# Altium PCB V3_Board.PcbDoc (part 1 of 7)
Units mil, origin at the board's own origin, x right, y up, seen from the top; angles counter-clockwise.
Board outline 6915 x 4422 mil, 2 copper layers (Top Layer, Bottom Layer), stack 57 mil thick; 364 components, 243 nets, 1048 pads, 599 vias.
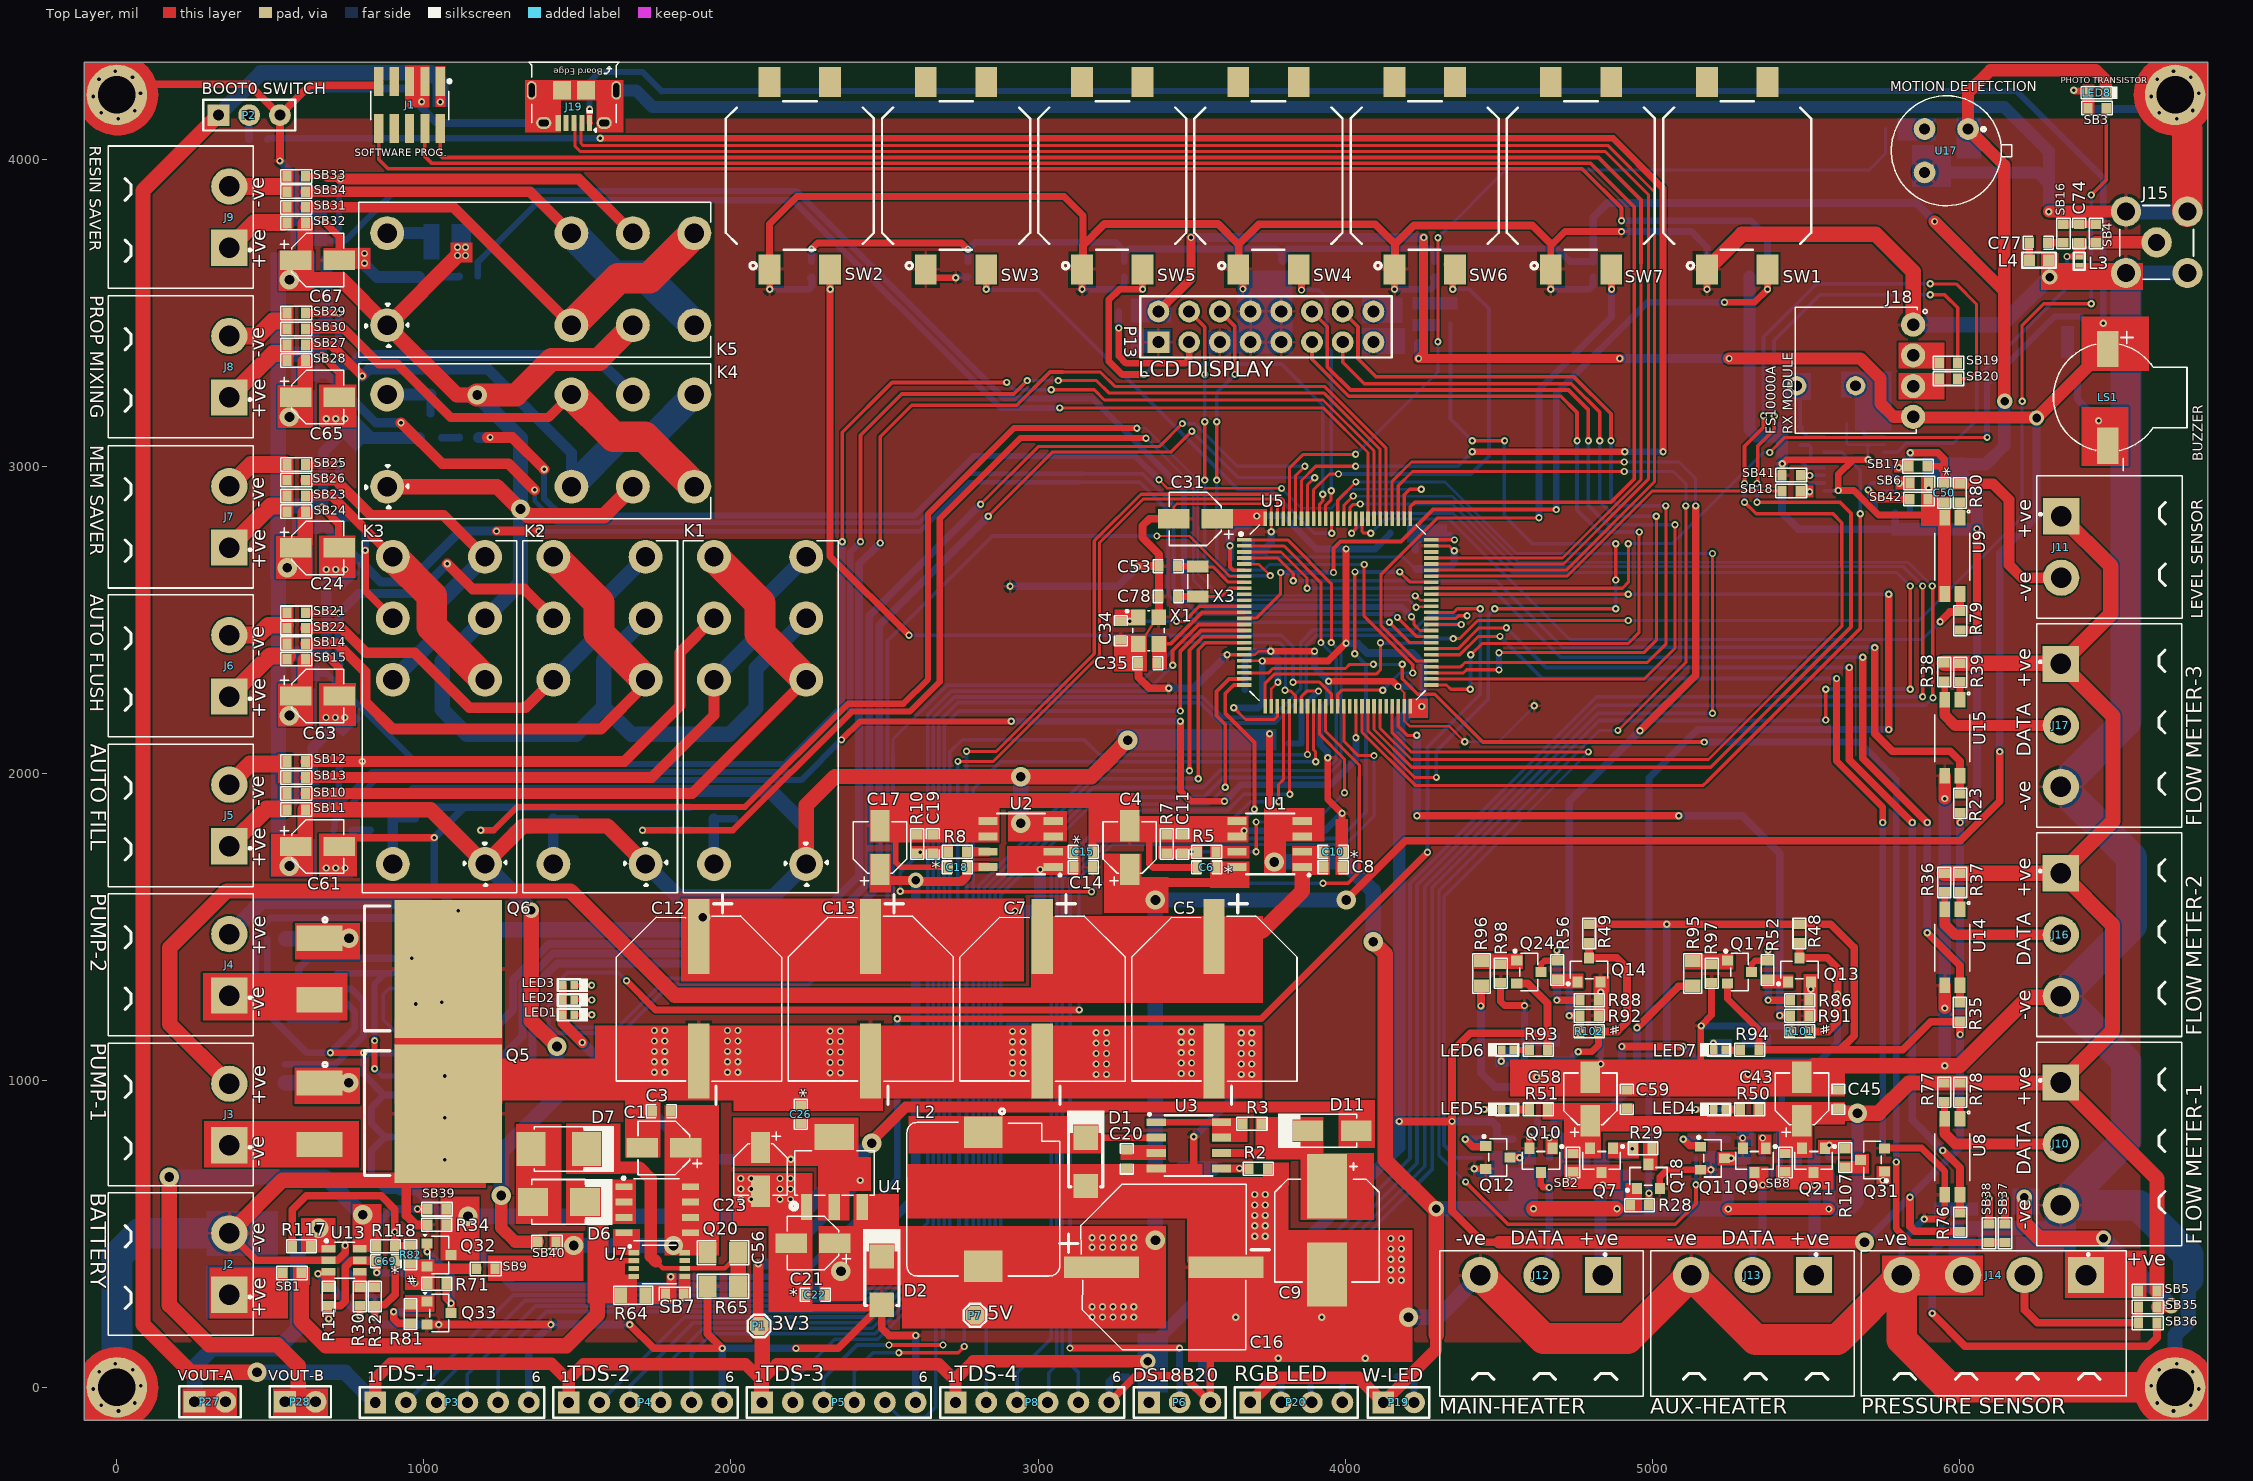
[diagram p0: Top Layer view]
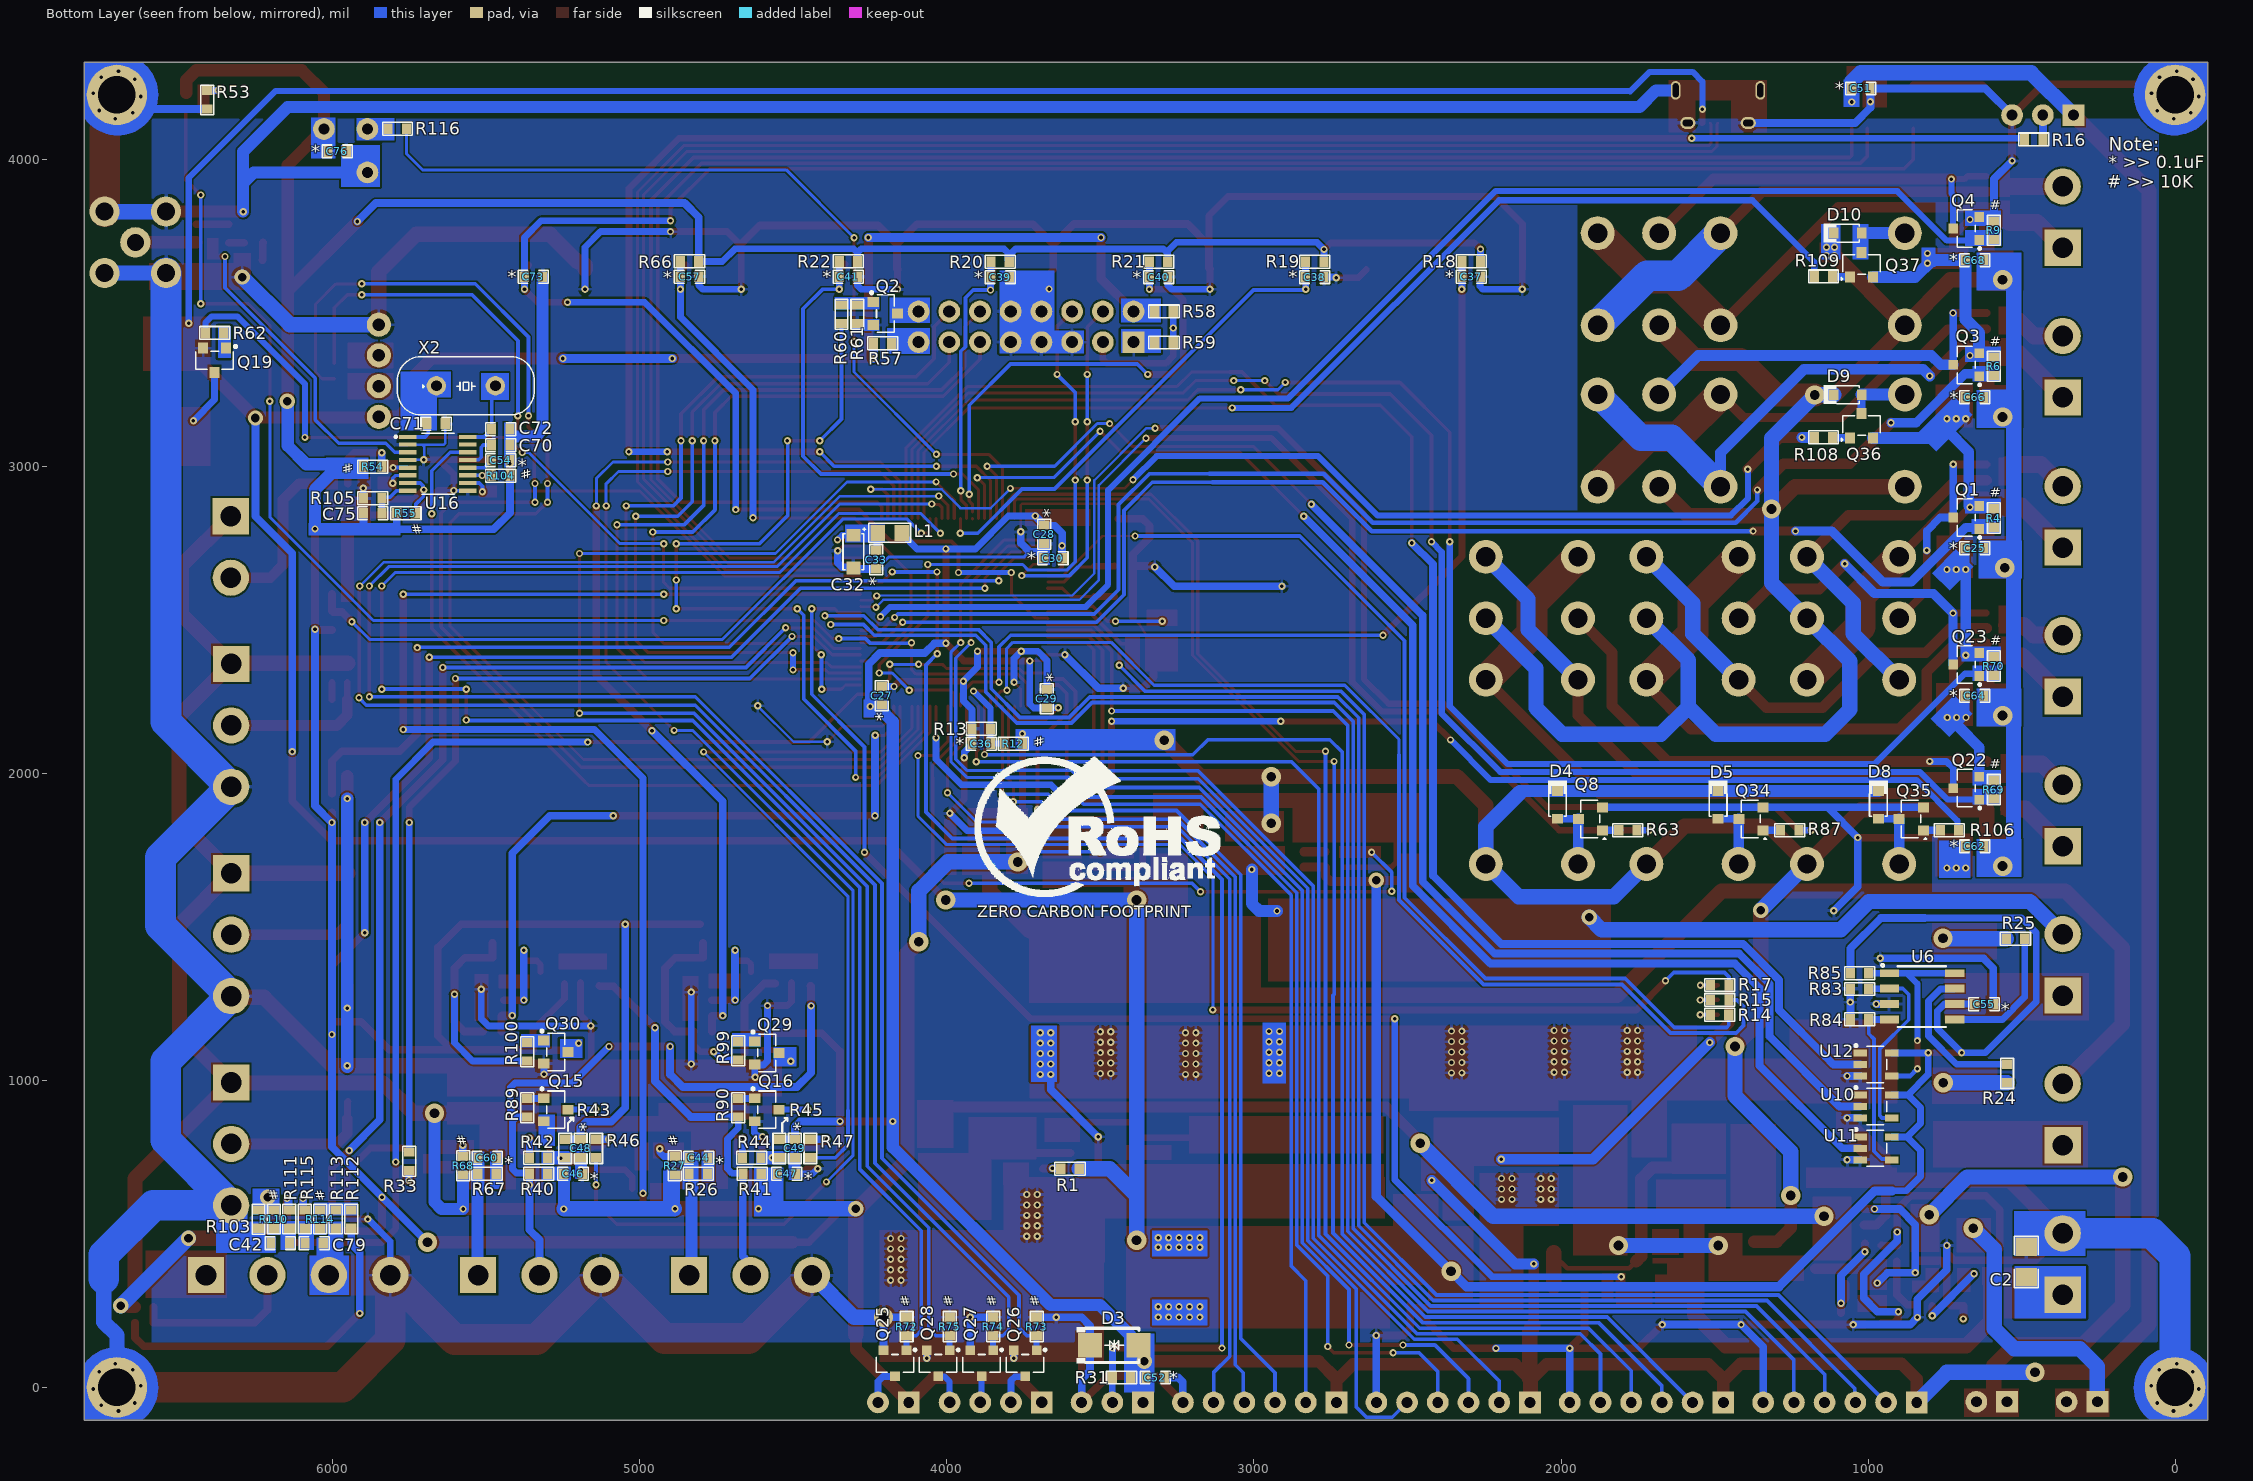
[diagram p1: Bottom Layer view, seen from below]
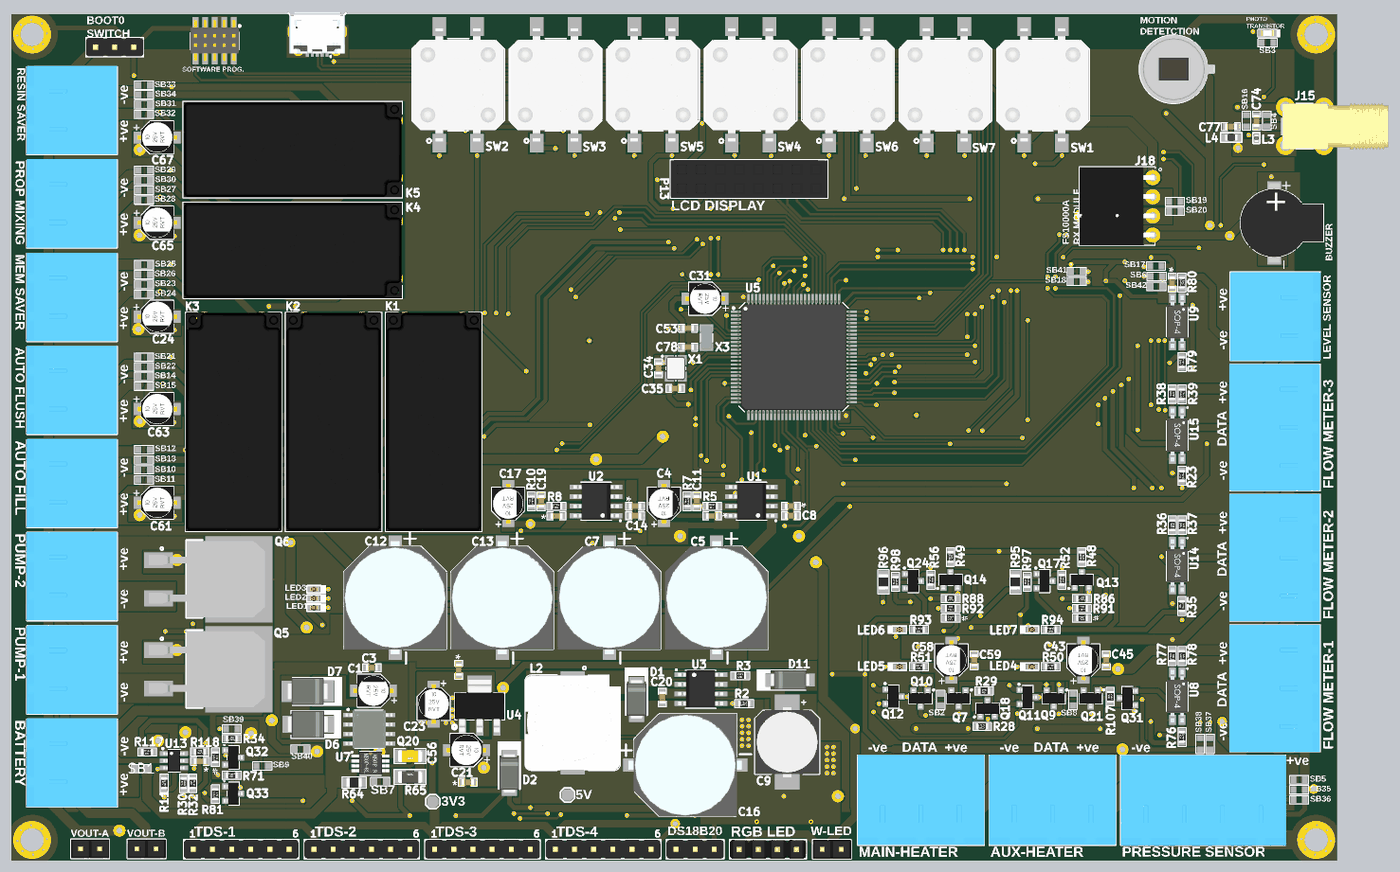
[diagram p5: 3D render of the assembled board from above, using the file's embedded part models]
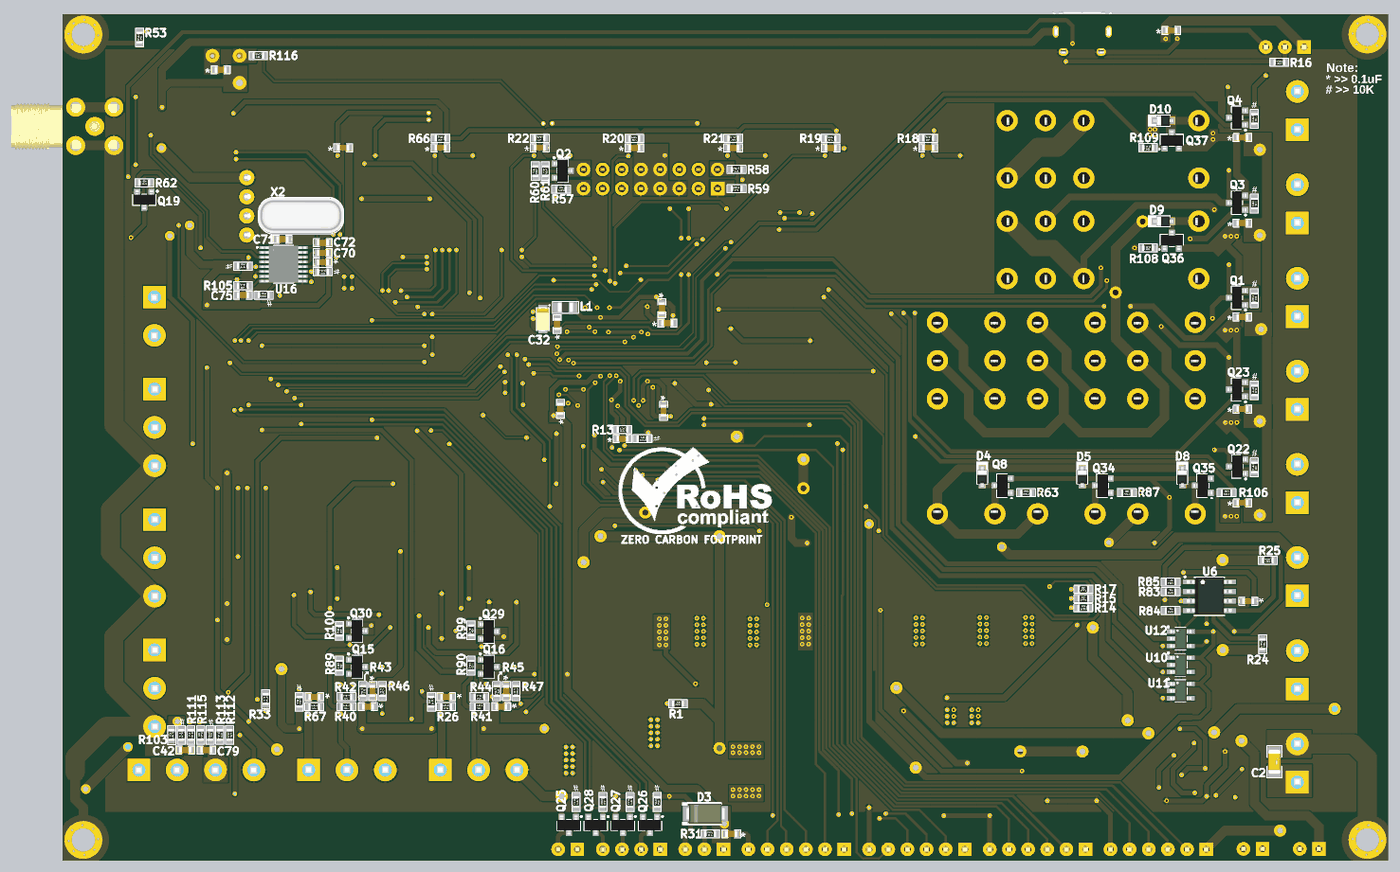
[diagram p6: 3D render of the assembled board from below, using the file's embedded part models]

## Layer stack, top to bottom
Top Solder: solder mask 3, Solder Resist, Dk 3.5
Top Layer: signal copper 10
Dielectric 1: dielectric 37, FR-4, Dk 4.8
Bottom Layer: signal copper 10
Bottom Solder: solder mask 3, Solder Resist, Dk 3.5

## Board outline
-105.86,-105.83 -105.86,4316.17 6809.14,4316.17 6809.14,-105.83

## Design rules (kind name [scope] priority, off if disabled: settings)
Clearance [All] p1: gap=6 ignorepadtopadclearanceinfootprint=FALSE except(4: Arc-SMDPad Track-SMDPad SMDPad-SMDPad)
ComponentClearance [All] p1: gap=0 collisioncheckmode=3 verticalgap=0 showdistances=FALSE
DiffPairsRouting [All] p1: maxlimit=10 minlimit=10 mostfreqgap=10 toplayer_minwidth=10 toplayer_maxwidth=15 toplayer_prefwidth=15 bottomlayer_minwidth=10 bottomlayer_maxwidth=15 bottomlayer_prefwidth=15 maxuncoupledlength=500
HoleSize [All] p1: absolutevalues=TRUE maxlimit=1000 minlimit=1 maxpercent=80.000 minpercent=20.000
HoleToHoleClearance [All] p1: gap=0 allowstackedmicrovias=TRUE
MatchedLengths "Schematic Matched Net Lengths" [InNetClass('USB_D')] p1: tolerance=50 checknetsindiffpair=TRUE checkdiffpairvsdiffpair=FALSE checkxsignals=FALSE checkothers=FALSE
MaxMinImpedance "Schematic Impedance Constraint" [InNetClass('USB_D')] p1: minimum=85.00 maximum=90.00
MinimumSolderMaskSliver [All] p1: minsoldermaskwidth=0
PolygonConnect [All] p1: connectstyle=Relief reliefconductorwidth=10 reliefentries=4 polygonreliefangle="90 Angle" airgapwidth=10
RoutingVias [All] p1: holewidth=11.81 width=23.62 viastyle="Through Hole" minholewidth=11.81 minwidth=23.62 maxholewidth=31.5 maxwidth=62.99
SilkToSilkClearance [All] p1: silktosilkclearance=0
SilkToSolderMaskClearance [IsPad] p1: minsilkscreentomaskgap=0 clearancetoexposedcopper=TRUE
SolderMaskExpansion SolderMaskExpansion_1 [IsVia] p1: expansion=0 istentingtop=FALSE soldermaskfromhole=TRUE
SolderMaskExpansion [Not IsVia] p2: expansion=4 istentingtop=FALSE
Width [All] p1: maxlimit=100 minlimit=8 preferedwidth=22 minimp=50.000000 maximp=50.000000 favimp=50.000000
23 further rules are at their usual default settings.

## Classes and differential pairs
differential pair class USB_D_Lines: USB_D
net class USB_D: USB_D_N USB_D_P
component class U_Voltage_Monitoring_Section: C69 P27 P28 Q32 Q33 R11 R30 R32 R34 R71 R81 R82 R117 R118 S SB9 SB39 U13
component class U_Temperature_Sense_Section: C52 D3 P3 P4 P5 P6 P8 R31
component class U_Valve_Section: C24 C25 C61 C62 C63 C64 C65 C66 C67 C68 D4 D5 D8 D9 D10 J5 J6 J7 J8 J9 K1 K2 K3 K4 K5 Q1 Q3 Q4 Q8 Q22 Q23 Q34 Q35 Q36 Q37 R4 R6 R9 R63 R69 R70 R87 R106 R108 R109 S SB10 SB11 SB12 SB13 SB14 SB15 SB21 SB22 SB23 SB24 SB25 SB26 SB27 SB28 SB29 SB30 SB31 SB32 SB33 SB34
component class U_Sensor_Section: J10 J11 J16 J17 R23 R35 R36 R37 R38 R39 R76 R77 R78 R79 R80 U8 U9 U14 U15
component class U_LED_Section: P19 P20 Q25 Q26 Q27 Q28 R72 R73 R74 R75 S
component class U_Heater_Section: C43 C44 C45 C46 C47 C48 C49 C58 C59 C60 J12 J13 LED4 LED5 LED6 LED7 Q7 Q9 Q10 Q11 Q12 Q13 Q14 Q15 Q16 Q17 Q18 Q21 Q24 Q29 Q30 Q31 R26 R27 R28 R29 R33 R40 R41 R42 R43 R44 R45 R46 R47 R48 R49 R50 R51 R52 R56 R67 R68 R86 R88 R89 R90 R91 R92 R93 R94 R95 R96 R97 R98 R99 R100 R101 R102 R107 S SB2 SB8
component class U_Switch_Sheet: C37 C38 C39 C40 C41 C57 R18 R19 R20 R21 R22 R66 SW2 SW3 SW4 SW5 SW6 SW7
component class U_Regulator_Section: C9 C16 C20 C21 C22 C23 C26 D1 D2 D11 L2 P1 P7 R1 R2 R3 U3 U4
component class U_Receiver_Section: C50 C54 C70 C71 C72 C74 C75 C77 J15 J18 L3 L4 R54 R55 R104 R105 S SB4 SB6 SB16 SB17 SB18 SB19 SB20 SB41 SB42 U16 X2
component class U_Gate_Driver_Section: 3 C55 J3 J4 Q5 Q6 R24 R25 R83 R84 R85 U6 U10 U11 U12
component class U_Current_Sense_Section: C4 C5 C6 C7 C8 C10 C11 C12 C13 C14 C15 C17 C18 C19 R5 R7 R8 R10 U1 U2
component class U_Controller_Section: C27 C28 C29 C30 C31 C32 C33 C34 C35 C36 C53 C73 C78 L1 LED1 LED2 LED3 P2 R12 R13 R14 R15 R16 R17 S SW1 U5 X1 X3
component class U_Connector_Section: C42 C51 C76 C79 J1 J14 J19 LED8 LS1 P13 Q2 Q19 R53 R57 R58 R59 R60 R61 R62 R103 R110 R111 R112 R113 R114 R115 R116 S SB3 SB5 SB35 SB36 SB37 SB38 U17
component class "U_Reverse Protection_Section": C1 C2 C3 C56 D6 D7 J2 Q20 R64 R65 SB1 SB7 SB40 U7
differential pair USB_D: +USB_D_P -USB_D_N

## Components (designator, comment, footprint, x,y, rotation, side; value= is the part's Value field where it differs from the comment)
C1 "10uF" RVT1E100M0405. 1782.62,781.02 r180 top locked
C2 "0.1uF" Cap-1206 486.22,409.22 r270 bottom locked
C3 "1uF" Cap0603 1773.77,900.12 r180 top locked
C4 "10uF" RVT1E100M0405. 3298.52,1758.11 r90 top locked
C5 "470uF" VT1H471MI135000CE0 3573.22,1266.16 r270 top locked
C6 "0.1uF" Cap0603 3549.52,1693.89 r180 top locked
C7 "470uF" VT1H471MI135000CE0 3013.89,1266.16 r270 top locked
C8 "1uF" Cap0603 3960.52,1694.89 r0 top locked
C9 "100uF" UWX1E101MCL1GB 3941.09,512.2 r270 top locked
C10 "0.1uF" Cap0603 3960.52,1744.89 r0 top locked
C11 "1uF" Cap0603 3470.31,1770.11 r90 top locked
C12 "470uF" VT1H471MI135000CE0 1895.22,1266.16 r270 top locked
C13 "470uF" VT1H471MI135000CE0 2454.56,1266.16 r270 top locked
C14 "1uF" Cap0603 3147.52,1694.89 r0 top locked
C15 "0.1uF" Cap0603 3147.52,1744.89 r0 top locked
C16 "470uF" VT1H471MI135000CE0 3409.4,392.13 r0 top locked
C17 "10uF" RVT1E100M0405. 2485.57,1758.11 r90 top locked
C18 "0.1uF" Cap0603 2737.52,1693.89 r180 top locked
C19 "1uF" Cap0603 2657.31,1770.11 r90 top locked
C20 "470pF" Cap0603 3289.52,744.78 r90 top locked
C21 "10uF" RVT1E100M0405. 2267.86,470.8 r180 top locked
C22 "0.1uF" Cap0603 2274.36,302.66 r180 top locked
C23 "10uF" RVT1E100M0405. 2096.6,711.14 r270 top locked
C24 "10uF" RVT1E100M0405. 654.14,2734.17 r0 top locked
C25 "0.1uF" Cap0603 653.14,2733.17 r0 bottom locked
C26 "0.1uF" Cap0603 2227.51,890.28 r90 top locked
C27 "0.1uF" Cap0603 4212.23,2253.01 r90 bottom locked
C28 "0.1uF" Cap0603 3682.46,2778.54 r270 bottom locked
C29 "0.1uF" Cap0603 3674,2243 r90 bottom locked
C30 "0.1uF" Cap0603 3654.46,2700.8 r0 bottom locked
C31 "10uF" RVT1E100M0405. 3513,2829 r180 top locked
C32 "1uF" "CAP-CASE A" 4304,2722 r270 bottom locked
C33 "0.1uF" Cap0603 4229.66,2696.33 r270 bottom locked
C34 "30pF" Cap0603 3270,2465 r90 top locked
C35 "30pF" Cap0603 3357,2359 r0 top locked
C36 "0.1uF" Cap0603 3888,2097 r0 bottom locked
C37 "0.1uF" Cap0603 2292.94,3617 r0 bottom locked
C38 "0.1uF" Cap0603 2802.3,3616 r0 bottom locked
C39 "0.1uF" Cap0603 3826.53,3616 r0 bottom locked
C40 "0.1uF" Cap0603 3310.41,3616 r0 bottom locked
C41 "0.1uF" Cap0603 4320.59,3617 r0 bottom locked
C42 "1uF" Cap-0603 6170,471 r0 bottom locked
C43 "10uF" RVT1E100M0405. 5487,939.59 r90 top locked
C44 "0.1uF" Cap0603 4808,749 r0 bottom locked
C45 "1uF" Cap0603 5606,939.59 r90 top locked
C46 "0.1uF" Cap0603 5217,697 r180 bottom locked
C47 "0.1uF" Cap0603 4521,697 r180 bottom locked
C48 "0.1uF" Cap0603 5192.5,779 r270 bottom locked
C49 "0.1uF" Cap0603 4494.5,779 r270 bottom locked
C50 "0.1uF" Cap-0603 5950,2913 r270 top locked
C51 "0.1uF" Cap0603 1024,4230 r180 bottom locked
C52 "0.1uF" Cap0603 3321.14,33.17 r180 bottom locked
C53 "20pF" Cap0603 3424,2675 r0 top locked
C54 "0.1uF" Cap-0603 5452,3019.33 r180 bottom locked
C55 "0.1uF" Cap0603 623.14,1248.17 r180 bottom locked
C56 "0.047uF" Cap-1206 1974,439 r180 top locked
C57 "0.1uF" Cap0603 4837.74,3617 r0 bottom locked
C58 "10uF" RVT1E100M0405. 4798,939.59 r90 top locked
C59 "1uF" Cap0603 4917,939.59 r90 top locked
C60 "0.1uF" Cap0603 5496,749 r0 bottom locked
C61 "10uF" RVT1E100M0405. 654.14,1762.17 r0 top locked
C62 "0.1uF" Cap0603 653.14,1762.17 r0 bottom locked
C63 "10uF" RVT1E100M0405. 654.14,2252.17 r0 top locked
C64 "0.1uF" Cap0603 653.14,2252.17 r0 bottom locked
C65 "10uF" RVT1E100M0405. 654.14,3225.17 r0 top locked
C66 "0.1uF" Cap0603 653.14,3224.17 r0 bottom locked
C67 "10uF" RVT1E100M0405. 654.14,3671.17 r0 top locked
C68 "0.1uF" Cap0603 653.14,3671.17 r0 bottom locked
C69 "0.1uF" Cap0603 877,412 r0 top locked
C70 "0.47uF" Cap0603 5452,3069 r180 bottom locked
C71 "20pF" Cap-0603 5663,3139 r0 bottom locked
C72 "20pF" Cap-0603 5452,3121 r0 bottom locked
C73 "0.1uF" Cap0603 5346,3617 r0 bottom locked
C74 "1.2pF" Cap0603 6390,3758 r90 top locked
C75 "2.2uF" Cap0603 5869,2847 r0 bottom locked
C76 "0.1uF" Cap0603 5985,4025 r180 bottom locked
C77 "1.5pF" Cap0603 6257,3728 r0 top locked
C78 "20pF" Cap0603 3424,2576 r0 top locked
C79 "1uF" Cap-0603 6060,470 r0 bottom locked
D1 "SS24A" SMA#1 3155.27,735.35 r270 top locked
D2 "1SMA5930BT3G" SMA#1 2491.29,348.94 r270 top locked
D3 "SMAJ5.0CA" SMAJ5.0CA 3455.14,138.17 r180 bottom locked
D4 "1N4148WS-7-F" SOD-323 2011.63,1897.72 r270 bottom locked
D5 "1N4148WS-7-F" SOD-323 1489,1897.72 r270 bottom locked
D6 "SMBJ70A/TR13" SMB 1440.37,604.84 r180 top locked
D7 "SS510B" SS510B 1439.32,777.09 r180 top locked
D8 "1N4148WS-7-F" SOD-323 967,1897.72 r270 bottom locked
D9 "1N4148WS-7-F" SOD-323 1067,3233 r180 bottom locked
D10 "1N4148WS-7-F" SOD-323 1067,3759 r180 bottom locked
D11 "SS32 /SMA(DO-214AC)" SMA#2 3957,837 r0 top
J1 "20021121-00010C4LF" 20021121-00010C4LF_ 953.84,4176.52 r180 top locked
J2 "TBP01R1-508-02BE" TBP01R1-508-02BE 366.94,402.72 r90 top locked
J3 "TBP01R1-508-02BE" TBP01R1-508-02BE 366.94,889.62 r90 top locked
J4 "TBP01R1-508-02BE" TBP01R1-508-02BE 366.94,1376.67 r90 top locked
J5 "TBP01R1-508-02BE" TBP01R1-508-02BE 366.94,1863.17 r90 top locked
J6 "TBP01R1-508-02BE" TBP01R1-508-02BE 366.94,2350.17 r90 top locked
J7 "TBP01R1-508-02BE" TBP01R1-508-02BE 366.94,2835.17 r90 top locked
J8 "TBP01R1-508-02BE" TBP01R1-508-02BE 366.94,3324.17 r90 top locked
J9 "TBP01R1-508-02BE" TBP01R1-508-02BE 366.94,3811.17 r90 top locked
J10 "TBP01R1-508-03BE" TBP01R1-508-03BE 6330,893.67 r270 top locked
J11 "TBP01R1-508-02BE" TBP01R1-508-02BE 6331,2737 r270 top locked
J12 "TBP01R1-508-03BE" TBP01R1-508-03BE 4739.17,366.64 r180 top locked
J13 "TBP01R1-508-03BE" TBP01R1-508-03BE 5426.17,366.64 r180 top locked
J14 "TBP01R1-508-04BE" TBP01R1-508-04BE 6212,366.64 r180 top locked
J15 "HJ-SMA508" HJ-SMA508 6642,3729 r270 top locked
J16 "TBP01R1-508-03BE" TBP01R1-508-03BE 6330,1575 r270 top locked
J17 "TBP01R1-508-03BE" TBP01R1-508-03BE 6330,2256.33 r270 top locked
J18 "XY-MK-5V Module" DW254W-11-04-85 5849,3461 r270 top locked
J19 "10118194-0001LF" 10118194-0001LF_ 1489.2,4117.7 r180 top locked
K1 "SMI-12VDC-SL-2C" DIP-8 2095,2205 r180 top locked
K2 "SMI-12VDC-SL-2C" DIP-8 1572.25,2205 r180 top locked
K3 "SMI-12VDC-SL-2C" DIP-8 1049.5,2205 r180 top locked
K4 "SMI-12VDC-SL-2C" DIP-8 1381,3083.75 r90 top locked
K5 "SMI-12VDC-SL-2C" DIP-8 1381,3609 r90 top locked
L1 "10uH" Ind0805 4186.14,2783.17 r0 bottom locked
L2 "220uH" SLF12575T-221M1R3-PF 2822,613.7 r270 top locked
L3 "39nH" "IND 0402" 6390,3668 r270 top locked
L4 "33nH" "IND 0603" 6259,3671 r0 top locked
LED1 "XZMDK68W-2" "LED 0402" 1471.95,1214.56 r0 top locked
LED2 "XZMDK68W-2" "LED 0402" 1471.95,1262.63 r0 top locked
LED3 "XZMDK68W-2" "LED 0402" 1471.95,1310.69 r0 top locked
LED4 "XZMDK68W-2" "LED 0402" 5218,906 r180 top locked
LED5 "XZMDK68W-2" "LED 0402" 4528,906 r180 top locked
LED6 "XZMDK68W-2" "LED 0402" 4528.04,1100 r180 top locked
LED7 "XZMDK68W-2" "LED 0402" 5217.96,1100 r180 top locked
LED8 "ALS-PT19-315C/L177/TR8" ALS-PT19-315C/L177/TR 6447,4216 r180 top locked
LS1 "YS-SBZ9032C03R16" YS-SBZ9032C03R16 6483.14,3224.17 r270 top locked
P1 "Test Point" "TEST POINT" 2092,201 r0 top locked
P2 "61300311121" HDR1X3 331.83,4143.14 r0 top locked
P3 "61300611121" HDR1X6 842.14,-47.83 r0 top locked
P4 "61300611121" HDR1X6 1471.89,-47.83 r0 top locked
P5 "61300611121" HDR1X6 2101.64,-47.83 r0 top locked
P6 "61300311121" HDR1X3 3361.14,-47.83 r0 top locked
P7 "Test Point" "TEST POINT" 2795,236 r0 top locked
P8 "61300611121" HDR1X6 2731.39,-47.83 r0 top locked
P13 "PPTC082LFBN-RC" HDR2X8 3742,3454 r0 top locked
P19 "61300211121" HDR1X2 4124.14,-47.83 r0 top locked
P20 "61300411121" HDR1X4 3691.14,-47.83 r0 top locked
P27 "61300211121" HDR1X2 254.14,-45.83 r0 top locked
P28 "61300211121" HDR1X2 548.14,-45.83 r0 top locked
Q1 "DMN13H750S-7" SOT23-3 681.32,2833.41 r90 bottom locked
Q2 "IRLML2502TRPBF" SOT-23 4200,3497 r270 bottom locked
Q3 "DMN13H750S-7" SOT23-3 681.32,3330.18 r90 bottom locked
Q4 "DMN13H750S-7" SOT23-3 681.32,3774.17 r90 bottom locked
Q5 "IRF3205STRLPBF" D2Pak 870.51,892.16 r270 top locked
Q6 "IRF3205STRLPBF" D2Pak 870.51,1363.17 r270 top locked
Q7 "IRLML6402TRPBF" SOT-23 4834.86,740.11 r180 top locked
Q8 "MMBT2222A-7-F" SOT-23 1904.63,1852 r90 bottom locked
Q9 "BC847B,215" SOT-23 5332,740.11 r180 top locked
Q10 "BC847B,215" SOT-23 4637,740.11 r180 top locked
Q11 "BC847B,215" SOT-23 5196,747 r270 top locked
Q12 "BC847B,215" SOT-23 4497,750 r270 top locked
Q13 "BC847B,215" SOT-23 5479,1360 r0 top locked
Q14 "BC847B,215" SOT-23 4794,1360 r0 top locked
Q15 "BC847B,215" SOT-23 5273,905 r270 bottom locked
Q16 "BC847B,215" SOT-23 4586,905 r270 bottom locked
Q17 "BC857C,215" SOT-23 5284,1353.45 r270 top locked
Q18 "MMBT5551" SOT-23 4987,688 r0 top locked
Q19 "MMBT5551" SOT-23 6383.87,3345.16 r0 bottom locked
Q20 "RU6085H" RU6085H 1759.64,579.38 r0 top locked
Q21 "IRLML6402TRPBF" SOT-23 5525,740.11 r180 top locked
Q22 "DMN13H750S-7" SOT23-3 680.86,1952.17 r90 bottom locked
Q23 "DMN13H750S-7" SOT23-3 681.32,2354.41 r90 bottom locked
Q24 "BC857C,215" SOT-23 4598,1353.45 r270 top locked
Q25 "DMN13H750S-7" SOT23-3 4168.55,79.17 r0 bottom locked
Q26 "DMN13H750S-7" SOT23-3 3745.14,79.17 r0 bottom locked
Q27 "DMN13H750S-7" SOT23-3 3886.64,79.17 r0 bottom locked
Q28 "DMN13H750S-7" SOT23-3 4028.14,79.17 r0 bottom locked
Q29 "BC847B,215" SOT-23 4586,1090 r270 bottom locked
Q30 "BC847B,215" SOT-23 5273,1093 r270 bottom locked
Q31 "MMBT5551" SOT-23 5717,742 r90 top locked
Q32 "AO3407" SOT-23 1050,432 r270 top locked
Q33 "MMBT2222A-7-F" SOT-23 1050,243 r270 top locked
Q34 "MMBT2222A-7-F" SOT-23 1382,1852 r90 bottom locked
Q35 "MMBT2222A-7-F" SOT-23 860,1852 r90 bottom locked
Q36 "MMBT2222A-7-F" SOT-23 1022,3131.98 r180 bottom locked
Q37 "MMBT2222A-7-F" SOT-23 1022,3656 r180 bottom locked
R1 "3.6K" RES-0603 3599,713 r0 bottom locked
R2 "1.2k" RES-0603 3717,713 r180 top locked
R3 "0.33R" RES-0603 3696.49,859.39 r0 top locked value=0.33Ω
R4 "10K" RES-0603 590.86,2831.46 r90 bottom locked
R5 "2.2K" RES-0603 3549.52,1744.89 r0 top locked
R6 "10K" RES-0603 590.86,3325.47 r90 bottom locked
R7 "470K" RES-0603 3419.31,1770.11 r270 top locked
R8 "2.2K" RES-0603 2737.52,1744.89 r0 top locked
R9 "10K" RES-0603 590.86,3768 r90 bottom locked
R10 "470K" RES-0603 2606.31,1770.11 r270 top locked
R11 "2.21M" RES-0603 690.14,296.87 r270 top locked
R12 "10K" RES-0603 3784,2097 r0 bottom locked
R13 "2.7K" RES-0603 3888,2145 r180 bottom locked
R14 "680R" RES-0603 1483.95,1213.69 r0 bottom locked
R15 "680R" RES-0603 1483.45,1262.46 r0 bottom locked
R16 "2.2K" RES-0603 461,4064 r180 bottom locked
R17 "680R" RES-0603 1483.45,1311.22 r0 bottom locked
R18 "2.2K" RES-0603 2292.94,3666.9 r180 bottom locked
R19 "2.2K" RES-0603 2802.3,3665.9 r180 bottom locked
R20 "2.2K" RES-0603 3826.53,3665.9 r180 bottom locked
R21 "2.2K" RES-0603 3310.41,3665.9 r180 bottom locked
R22 "2.2K" RES-0603 4320.59,3666.9 r180 bottom locked
R23 "3.3K" RES-0603 6002,1903 r270 top locked
R24 "47R" RES-0603 548.14,1023.17 r90 bottom locked
R25 "47R" RES-0603 520.82,1462.06 r180 bottom locked
R26 "1K" RES-0603 4809,697 r180 bottom locked
R27 "10K" RES-0603 4886,723 r270 bottom locked
R28 "4.7K" Res-0603 4958.69,593.69 r180 top locked
R29 "1K" Res-0603 4969,779 r0 top locked
R30 "20K" RES-0603 792.14,296.87 r270 top locked
R31 "4.7K" RES-0603 3431.14,33.17 r180 bottom locked
R32 "63.4K" RES-0603 840.14,297.17 r270 top locked
R33 "4.7K" RES-0603 5750,737 r270 bottom locked
R34 "1K" RES-0603 1043,530 r180 top locked
R35 "3.3K" RES-0603 6001,1223 r270 top locked
R36 "3.3K" RES-0603 5951,1645 r90 top locked
R37 "2.2K" RES-0603 6002,1645 r90 top locked
R38 "3.3K" Res-0603 5950,2330 r90 top locked
R39 "2.2K" RES-0603 6002,2329 r90 top locked
R40 "1K" RES-0603 5329,697 r180 bottom locked
R41 "1K" RES-0603 4634,697 r180 bottom locked
R42 "4.7K" RES-0603 5329,749 r180 bottom locked
R43 "4.7K" RES-0603 5243,779 r90 bottom locked
R44 "4.7K" RES-0603 4635,749 r180 bottom locked
R45 "4.7K" RES-0603 4545,779 r90 bottom locked
R46 "4.7K" RES-0603 5142,779 r270 bottom locked
R47 "4.7K" RES-0603 4444,779 r270 bottom locked
R48 "4.7K" RES-0603 5479,1479 r90 top locked
R49 "4.7K" RES-0603 4794,1479 r90 top locked
R50 "1K" RES-0603 5317,906 r0 top locked
R51 "1K" RES-0603 4629,906 r0 top locked
R52 "4.7K" RES-0603 5375,1360 r90 top locked
R53 "4.7K" Res-0603 6408,4193 r90 bottom locked
R54 "10K" RES-0603 5869,2999 r0 bottom locked
R55 "10K" RES-0603 5761,2847 r0 bottom locked
R56 "4.7K" RES-0603 4691,1360 r90 top locked
R57 "0R" RES-0603 4209,3400 r0 bottom locked
R58 "4.7K" RES-0603 3293,3504 r180 bottom locked
R59 "4.7K" RES-0603 3293,3403 r180 bottom locked
R60 "1K" RES-0603 4343,3495 r270 bottom locked
R61 "1K" RES-0603 4291,3495 r270 bottom locked
R62 "4.7K" RES-0603 6384,3434 r0 bottom locked
R63 "4.7K" RES-0603 1782.63,1815 r0 bottom locked
R64 "100K" RES-0805 1682,301 r0 top locked
R65 "1K" Res-1206 1974,330 r0 top locked
R66 "2.2K" RES-0603 4837.74,3666.9 r180 bottom locked
R67 "1K" RES-0603 5497,697 r180 bottom locked
R68 "10K" RES-0603 5575,723 r270 bottom locked
R69 "10K" RES-0603 590.86,1947.46 r90 bottom locked
R70 "10K" RES-0603 590.86,2349.69 r90 bottom locked
R71 "1K" RES-0603 1043,339 r0 top locked
R72 "10K" RES-0603 4131.14,199.17 r90 bottom locked
R73 "10K" RES-0603 3707.73,199.17 r90 bottom locked
R74 "10K" RES-0603 3849.23,199.17 r90 bottom locked
R75 "10K" RES-0603 3990.73,199.17 r90 bottom locked
R76 "3.3K" RES-0603 6002,539 r270 top locked
R77 "3.3K" RES-0603 5950,962 r90 top locked
R78 "2.2K" RES-0603 6002,962 r90 top locked
R79 "3.3K" RES-0603 6002,2497 r270 top locked
R80 "2.2K" RES-0603 6001,2913 r90 top locked
R81 "470R" RES-0603 957,240 r90 top locked
R82 "10K" RES-0603 957,433 r90 top locked
R83 "200K" RES-0603 1028.14,1298.17 r0 bottom locked
R84 "200K" RES-0603 1028.14,1199.17 r0 bottom locked
R85 "1K" RES-0603 1028.14,1349.17 r0 bottom locked
R86 "4.7K" RES-0603 5480,1262 r180 top locked
R87 "4.7K" RES-0603 1256,1815 r0 bottom locked
R88 "4.7K" RES-0603 4794.45,1262 r180 top locked
R89 "100K" RES-0603 5366,911.55 r90 bottom locked
R90 "100K" RES-0603 4679,911.55 r90 bottom locked
R91 "1M" RES-0603 5480,1211 r180 top locked
R92 "1M" RES-0603 4794.45,1211 r180 top locked
R93 "330R" RES-0603 4629,1100 r0 top locked
R94 "330R" RES-0603 5317,1100 r0 top locked
R95 "50K" "RES 0805" 5132,1349 r270 top locked
R96 "50K" "RES 0805" 4444,1349 r270 top locked
R97 "150K" RES-0603 5193,1349 r270 top locked
R98 "150K" RES-0603 4506,1349 r270 top locked
R99 "100K" RES-0603 4679,1096.55 r90 bottom locked
R100 "100K" RES-0603 5366,1094 r90 bottom locked
R101 "10K" RES-0603 5480,1160 r0 top locked
R102 "10K" RES-0603 4794.45,1160 r0 top locked
R103 "150R" RES-0603 6241,549 r270 bottom locked
R104 "10K" RES-0603 5452,2969.67 r180 bottom locked
R105 "100K" RES-0603 5869,2895.67 r180 bottom locked
R106 "4.7K" RES-0603 736,1815 r0 bottom locked
R107 "1K" Res-0603 5628,749 r270 top locked
R108 "4.7K" Res-0603 1146,3094 r180 bottom locked
R109 "4.7K" Res-0603 1146,3618 r180 bottom locked
R110 "10K" Res-0603 6190.67,549 r270 bottom locked
R111 "2.2K" Res-0603 6140.33,549 r270 bottom locked
R112 "7.5K" Res-0603 5939,549 r90 bottom locked
R113 "3.3K" Res-0603 5989.33,549 r90 bottom locked
R114 "10K" Res-0603 6039.67,549 r90 bottom locked
R115 "2.2K" Res-0603 6090,549 r270 bottom locked
R116 "20K" Res-0603 5789,4099 r180 bottom locked
R117 "0R" Res-0603 602,460 r0 top locked
R118 "0R" Res-0603 876,461 r180 top locked
SB1 "Solder Bridge" "Solder Bridge" 571,374 r180 top locked
SB2 "Solder Bridge" "Solder Bridge" 4742,733 r270 top locked
SB3 "Solder Bridge" "Solder Bridge" 6448,4166 r0 top locked
SB4 "Solder Bridge" "Solder Bridge" 6444,3758 r270 top locked
SB5 "Solder Bridge" "Solder Bridge" 6613,315 r180 top locked
SB6 "Solder Bridge" "Solder Bridge" 5869,2945.33 r0 top locked
SB7 "Solder Bridge" "Solder Bridge" 1816.92,305.39 r180 top locked
SB8 "Solder Bridge" "Solder Bridge" 5433,733 r270 top locked
SB9 "Solder Bridge" "Solder Bridge" 1202,387 r180 top locked
SB10 "Solder Bridge" "Solder Bridge" 584.84,1934.33 r180 top locked
SB11 "Solder Bridge" "Solder Bridge" 584.84,1882 r180 top locked
SB12 "Solder Bridge" "Solder Bridge" 584.84,2039 r180 top locked
SB13 "Solder Bridge" "Solder Bridge" 584.84,1986.67 r180 top locked
SB14 "Solder Bridge" "Solder Bridge" 584.84,2422.33 r180 top locked
SB15 "Solder Bridge" "Solder Bridge" 584.84,2372 r180 top locked
SB16 "Solder Bridge" "Solder Bridge" 6338,3758 r90 top locked
SB17 "Solder Bridge" "Solder Bridge" 5865,3000 r180 top locked
SB18 "Solder Bridge" "Solder Bridge" 5452,2919 r180 top locked
SB19 "Solder Bridge" "Solder Bridge" 5964,3336 r180 top locked
SB20 "Solder Bridge" "Solder Bridge" 5964,3285 r180 top locked
SB21 "Solder Bridge" "Solder Bridge" 584.84,2523 r180 top locked
SB22 "Solder Bridge" "Solder Bridge" 584.84,2472.67 r180 top locked
SB23 "Solder Bridge" "Solder Bridge" 584.84,2903.33 r180 top locked
SB24 "Solder Bridge" "Solder Bridge" 584.84,2852 r180 top locked
SB25 "Solder Bridge" "Solder Bridge" 584.84,3006 r180 top locked
SB26 "Solder Bridge" "Solder Bridge" 584.84,2954.67 r180 top locked
SB27 "Solder Bridge" "Solder Bridge" 584.84,3395 r180 top locked
SB28 "Solder Bridge" "Solder Bridge" 584.84,3344 r180 top locked
SB29 "Solder Bridge" "Solder Bridge" 584.84,3499 r180 top locked
SB30 "Solder Bridge" "Solder Bridge" 584.84,3447 r180 top locked
SB31 "Solder Bridge" "Solder Bridge" 584.84,3843 r180 top locked
SB32 "Solder Bridge" "Solder Bridge" 584.84,3792 r180 top locked
SB33 "Solder Bridge" "Solder Bridge" 584.84,3944 r180 top locked
SB34 "Solder Bridge" "Solder Bridge" 584.84,3894 r180 top locked
SB35 "Solder Bridge" "Solder Bridge" 6613,263 r180 top locked
SB36 "Solder Bridge" "Solder Bridge" 6613,211 r180 top locked
SB37 "Solder Bridge" "Solder Bridge" 6148,503 r270 top locked
SB38 "Solder Bridge" "Solder Bridge" 6096,503 r270 top locked
SB39 "Solder Bridge" "Solder Bridge" 1043,581 r0 top locked
SB40 "Solder Bridge" "Solder Bridge" 1401,475 r180 top locked
SB41 "Solder Bridge" "Solder Bridge" 5452,2971 r180 top locked
SB42 "Solder Bridge" "Solder Bridge" 5868,2893 r0 top locked
SW1 "Tactile Switch" TL3300CF160Q 5276.14,3946.16 r90 top locked
SW2 "Tactile Switch" TL3300CF160Q 2224.44,3946.16 r90 top locked
SW3 "Tactile Switch" TL3300CF160Q 2733.06,3946.16 r90 top locked
SW4 "Tactile Switch" TL3300CF160Q 3750.29,3946.16 r90 top locked
SW5 "Tactile Switch" TL3300CF160Q 3241.68,3946.16 r90 top locked
SW6 "Tactile Switch" TL3300CF160Q 4258.91,3946.16 r90 top locked
SW7 "Tactile Switch" TL3300CF160Q 4767.52,3946.16 r90 top locked
U1 "ACS723LLCTR-20AU-T" SOIC-8 3755.52,1769.89 r180 top locked
U2 "ACS723LLCTR-20AU-T" SOIC-8 2944.52,1769.89 r180 top locked
U3 "MC34063ADR" SOIC-8 3489.99,789.09 r0 top locked
U4 "LMS8117AMP-3.3/NOPB" SOT-223 2336.76,702.28 r0 top locked
U5 "STM32F072VBT6" LQFP-100 3975.87,2524.16 r0 top locked
U6 "NCP81071ADR2G" SOIC-8 826.14,1274.17 r180 bottom locked
U7 "LTC4359CMS8#PBF" LTC4359CMS8#PBF 1766.88,401.1 r0 top locked
U8 "PS2801C-1-F3-A" PS2801C-1-F3-A 5977,752 r270 top locked
U9 "PS2801C-1-F3-A" PS2801C-1-F3-A 5977,2708 r270 top locked
U10 "SN74LV1T34DBVR" SOT-23-5 975.14,915.67 r180 bottom locked
U11 "SN74LV1T34DBVR" SOT-23-5 975.14,779.17 r180 bottom locked
U12 "SN74LV1T34DBVR" SOT-23-5 975.14,1052.17 r180 bottom locked
U13 "TPS3700DDCR" SOT-23-6 741.14,415.17 r0 top locked
U14 "PS2801C-1-F3-A" PS2801C-1-F3-A 5977,1434 r270 top locked
U15 "PS2801C-1-F3-A" PS2801C-1-F3-A 5977,2116 r270 top locked
U16 "MICRF220AYQS" 16-QSOP 5657,3008 r180 bottom locked
U17 "AS312" AS312 5921.93,4062.64 r225 top locked
X1 "8MHz" XC32M4-8.000-F18LJDT 3360,2465 r270 top locked
X2 "13.52313MHz" HC-49S-2P 5566,3262 r180 bottom locked
X3 "32.768kHz" X321532768KGD2SI 3520,2625 r270 top locked

## Footprints (in the part's own frame and the unit in brackets; to place one, negate y for a bottom-side part, rotate by r counter-clockwise, add the part's x,y. Pads: shape width x height; smd on the part's side, far side on the other; paste and mask are expansions set on the pad)
16-QSOP [mm]
  rect 1.45x0.35 smd: 1(-2.475,2.223) 2(-2.475,1.588) 3(-2.475,0.953) 4(-2.475,0.318) 5(-2.475,-0.317) 6(-2.475,-0.952) 7(-2.475,-1.587) 8(-2.475,-2.222) 9(2.475,-2.223) 10(2.475,-1.588) 11(2.475,-0.953) 12(2.475,-0.318) 13(2.475,0.317) 14(2.475,0.952) 15(2.475,1.587) 16(2.475,2.222)
  silkscreen extent -3.54,-2.51 1.35,2.51, body extent -3,-2.45 3,2.45, height 1.76
10118194-0001LF_ [mm]
  rect 0.42x1.35 smd: 1(-1.3,0) 2(-0.65,0) 3(0,0) 4(0.65,0) 5(1.3,0)
  oval 1.25x1 hole 0.55 slot 0.85 at 0 deg: MH1(-2.5,0) MH2(2.5,0)
  oval 0.8x1.55 hole 0.5 slot 1.15 at 90 deg: MH3(-3.5,-2.7) MH4(3.5,-2.7)
  rect 1.5x1.55 smd: MP1(-1,-2.7) MP2(1,-2.7)
  Top Layer region: 193 vertices and 0 holes, not listed, extent 2.3,-3.48 4,-1.925
  Top Layer region: 193 vertices and 0 holes, not listed, extent -4,-3.475 -2.3,-1.92
  silkscreen extent -3.73,-5 3.72,0.71, body extent -4.02,-5.34 4.03,0.19, height 2.69
20021121-00010C4LF_ [mm]
  rect 0.76x2.4 smd: 1(-2.54,-1.95) 2(-2.54,1.95) 3(-1.27,-1.95) 4(-1.27,1.95) 5(0,-1.95) 6(0,1.95) 7(1.27,-1.95) 8(1.27,1.95) 9(2.54,-1.95) 10(2.54,1.95)
  silkscreen extent -3.43,-2.08 3.23,1.22, body extent -3.17,-2.78 3.18,2.72, height 4.5
ALS-PT19-315C/L177/TR [mm]
  rect 0.82x0.82 smd: 1(-0.75,0) 2(0.75,0)
  silkscreen extent -1.7,-0.53 1.27,0.53, body extent -0.85,-0.4 0.85,0.4, height 0.6
AS312 [mm]
  round 1.8 hole 0.9: 1(-2.54,1.27) 2(0,-1.27) 3(2.54,1.27)
  silkscreen extent -4.55,-3.28 4.55,5.82, body extent -4.58,-3.25 4.52,5.85, height 4.25
Cap0603 [mil]
  rect 30x35 smd mask+2.36: 1(-30,0) 2(30,0)
  silkscreen extent -49,-21 49,21, body extent -32,-16 31,16, height 34
Cap-0603 [mil]
  rect 30x35 smd mask+2.36: 1(-30,0) 2(30,0)
  silkscreen extent -49,-21 49,21, body extent -32,-16 31,16, height 34
Cap-1206 [mil] "SMD 1206"
  rect 60x70 smd: 1(-50,0) 2(50,0)
  silkscreen extent -84,-39 84,39, body extent -63,-31 63,32, height 39
"CAP-CASE A" [mm]
  rect 1.06x1.19 smd: 1(-1.355,0) 1(-1.355,0) 2(1.355,0)
  silkscreen extent -1.98,-0.86 1.5,1.01, body extent -1.6,-0.8 1.6,0.8, height 1.8
D2Pak [mm]
  rect 2.08x3.81 smd: 1(-2.54,-5.335) 3(2.54,-5.335)
  rect 11.43x8.89 smd: 2(0,5.335)
  silkscreen extent -5.21,-5.05 5.11,0.51, body extent -5.08,-6.6 5.02,8.79, height 4.5
DIP-8 [mm]
  round 2.8 hole 1.6: 1(-3.81,12.7) 2(-3.81,-2.54) 3(-3.81,-7.62) 4(-3.81,-12.7) 5(3.81,-12.7) 6(3.81,-7.62) 7(3.81,-2.54) 8(3.81,12.7)
  silkscreen extent -6.45,-14.05 6.35,15.06, body extent -6.4,-13.99 6.3,15.01, height 18.5
DW254W-11-04-85 [mm] "2.54mm 3A Shrouded 1x4P side 8.5mm 4 1 Square Holes Plugin,P=2.54mm Female Headers ROHS"
  round 2 hole 1.02: 1(0,0) 2(2.54,0) 3(5.08,0) 4(7.62,0)
  silkscreen extent -1.45,-9.73 8.99,1.16, body extent -1.42,-9.72 8.99,0.34, height 2.8
HC-49S-2P [mm]
  round 1.6 hole 0.9: 1(-2.44,0) 2(2.44,0)
  silkscreen extent -5.66,-2.41 5.66,2.41, body extent -5.7,-2.29 5.65,2.36, height 3.7
HDR1X2 [mm] "CONN HEADER VERT 2POS 2.54MM"
  rect 1.8x1.8 hole 0.9: 1(0,0)
  round 1.8 hole 0.9: 2(2.54,0)
  silkscreen extent -1.27,-1.27 3.81,1.27, body extent -1.27,-1.27 3.81,1.27, height 8.44
HDR1X3 [mm] "Connector; Header; 3 Position"
  rect 1.8x1.8 hole 0.9: 1(0,0)
  round 1.8 hole 0.9: 2(2.54,0) 3(5.08,0)
  silkscreen extent -1.27,-1.27 6.35,1.27, body extent -1.27,-1.24 6.35,1.25, height 8.54
HDR1X4 [mm] "Connector; Header; 4 Position"
  rect 1.8x1.8 hole 0.95: 1(0,0)
  round 1.8 hole 0.95: 2(2.54,0) 3(5.08,0) 4(7.62,0)
  silkscreen extent -1.27,-1.27 8.89,1.27, body extent -1.27,-1.27 8.89,1.27, height 9.5
HDR1X6 [mm] "Connector; Header; 6 Position"
  rect 1.8x1.8 hole 0.9: 1(0,0)
  round 1.8 hole 0.9: 2(2.54,0) 3(5.08,0) 4(7.62,0) 5(10.16,0) 6(12.7,0)
  silkscreen extent -1.27,-1.27 13.97,1.27, body extent -1.27,-1.24 13.97,1.25, height 8.54
HDR2X8 [mm] "Connector; Header; 8x2 Position"
  rect 1.8x1.8 hole 1: 1(-8.89,-1.27)
  round 1.8 hole 1: 2(-8.89,1.27) 3(-6.35,-1.27) 4(-6.35,1.27) 5(-3.81,-1.27) 6(-3.81,1.27) 7(-1.27,-1.27) 8(-1.27,1.27) 9(1.27,-1.27) 10(1.27,1.27) 11(3.81,-1.27) 12(3.81,1.27) 13(6.35,-1.27) 14(6.35,1.27) 15(8.89,-1.27) 16(8.89,1.27)
  silkscreen extent -10.39,-2.54 10.41,2.54, body extent -10.41,-2.5 10.41,2.5, height 8.5
HJ-SMA508 [mm]
  round 2.5 hole 1.4: 1(0,0)
  round 2.5 hole 1.5: 2(-2.54,2.54) 3(-2.54,-2.54) 4(2.54,-2.54) 5(2.54,2.54)
  silkscreen extent -3.05,-3.05 3.05,3.05, body extent -3,-2.95 3,11.05, height 9.6
Ind0805 [mm] "Inductor 0805"
  rect 1.2x1.32 smd: 1(-1,0) 2(1,0)
  silkscreen extent -1.72,-0.79 1.73,0.79, body extent -1,-0.62 1,0.63, height 0.47
"IND 0402" [mm]
  rect 0.4x0.6 smd: 1(-0.35,0) 2(0.35,0)
  silkscreen extent -0.71,-0.46 0.71,0.46, body extent -0.5,-0.25 0.5,0.25, height 0.25
"IND 0603" [mm]
  rect 0.9x0.97 smd: 1(-0.785,0) 2(0.785,0)
  silkscreen extent -1.4,-0.64 1.4,0.64, body extent -0.8,-0.4 0.8,0.4, height 0.78
"LED 0402" [mm]
  rect 0.62x0.72 smd: 1(-0.475,0) 2(0.475,0)
  silkscreen extent -0.91,-0.56 1.6,0.56, body extent -0.5,-0.25 0.51,0.25, height 0.45
LQFP-100 [mm]
  rect 1.2x0.3 smd: 1(-7.75,6) 2(-7.75,5.5) 3(-7.75,5) 4(-7.75,4.5) 5(-7.75,4) 6(-7.75,3.5) 7(-7.75,3) 8(-7.75,2.5) 9(-7.75,2) 10(-7.75,1.5) 11(-7.75,1) 12(-7.75,0.5) 13(-7.75,0) 14(-7.75,-0.5) 15(-7.75,-1) 16(-7.75,-1.5) 17(-7.75,-2) 18(-7.75,-2.5) 19(-7.75,-3) 20(-7.75,-3.5) 21(-7.75,-4) 22(-7.75,-4.5) 23(-7.75,-5) 24(-7.75,-5.5) 25(-7.75,-6) 51(7.75,-6) 52(7.75,-5.5) 53(7.75,-5) 54(7.75,-4.5) 55(7.75,-4) 56(7.75,-3.5) 57(7.75,-3) 58(7.75,-2.5) 59(7.75,-2) 60(7.75,-1.5) 61(7.75,-1) 62(7.75,-0.5) 63(7.75,0) 64(7.75,0.5) 65(7.75,1) 66(7.75,1.5) 67(7.75,2) 68(7.75,2.5) 69(7.75,3) 70(7.75,3.5) 71(7.75,4) 72(7.75,4.5) 73(7.75,5) 74(7.75,5.5) 75(7.75,6)
  rect 0.3x1.2 smd: 26(-6,-7.75) 27(-5.5,-7.75) 28(-5,-7.75) 29(-4.5,-7.75) 30(-4,-7.75) 31(-3.5,-7.75) 32(-3,-7.75) 33(-2.5,-7.75) 34(-2,-7.75) 35(-1.5,-7.75) 36(-1,-7.75) 37(-0.5,-7.75) 38(0,-7.75) 39(0.5,-7.75) 40(1,-7.75) 41(1.5,-7.75) 42(2,-7.75) 43(2.5,-7.75) 44(3,-7.75) 45(3.5,-7.75) 46(4,-7.75) 47(4.5,-7.75) 48(5,-7.75) 49(5.5,-7.75) 50(6,-7.75) 76(6,7.75) 77(5.5,7.75) 78(5,7.75) 79(4.5,7.75) 80(4,7.75) 81(3.5,7.75) 82(3,7.75) 83(2.5,7.75) 84(2,7.75) 85(1.5,7.75) 86(1,7.75) 87(0.5,7.75) 88(0,7.75) 89(-0.5,7.75) 90(-1,7.75) 91(-1.5,7.75) 92(-2,7.75) 93(-2.5,7.75) 94(-3,7.75) 95(-3.5,7.75) 96(-4,7.75) 97(-4.5,7.75) 98(-5,7.75) 99(-5.5,7.75) 100(-6,7.75)
  silkscreen extent -8.13,-7.27 7.24,7.24, body extent -8,-8 8,8, height 1.6
LTC4359CMS8#PBF [mm]
  rect 0.889x0.42 smd: 1(-2.105,0.975) 2(-2.105,0.325) 3(-2.105,-0.325) 4(-2.105,-0.975) 5(2.105,-0.975) 6(2.105,-0.325) 7(2.105,0.325) 8(2.105,0.975)
  silkscreen extent -2.51,-1.57 1.42,1.57, body extent -2.46,-1.53 2.46,1.52, height 1.01
PS2801C-1-F3-A [mm]
  rect 1.3x0.9 smd: 1(-3.15,0.635) 2(-3.15,-0.635) 3(3.15,-0.635) 4(3.15,0.635)
  silkscreen extent -3.77,-1.45 2,1.45, body extent -3.5,-1.4 3.5,1.4, height 2.1
"RES 0805" [mil] "SMD 0805"
  rect 40x50 smd: 1(-40,0) 2(40,0)
  silkscreen extent -64,-29 64,29, body extent -39,-25 39,24, height 24
RES-0603 [mil]
  rect 30x35 smd: 1(-30,0) 2(30,0)
  silkscreen extent -49,-21 49,21, body extent -31,-17 31,17, height 18
Res-0603 [mil]
  rect 30x35 smd: 1(-30,0) 2(30,0)
  silkscreen extent -48,-21 48,21, body extent -31,-17 31,17, height 18
RES-0805 [mil] "SMD 0805"
  rect 40x50 smd: 1(-40,0) 2(40,0)
  silkscreen extent -64,-29 64,29, body extent -39,-25 39,24, height 24
Res-1206 [mil]
  rect 60x70 smd: 1(-50,0) 2(50,0)
  silkscreen extent -84,-39 84,39, body extent -63,-31 63,32, height 39
RU6085H [mm]
  rect 1.4x0.57 smd: 1(-2.75,1.905) 2(-2.75,0.635) 3(-2.75,-0.635) 4(-2.75,-1.905) 5(2.75,-1.905) 6(2.75,-0.635) 7(2.75,0.635) 8(2.75,1.905)
  silkscreen extent -2.88,-2.57 1.85,2.72, body extent -3.1,-2.5 3.1,2.5, height 1.5
RVT1E100M0405. [mm] "10uF 25V 5.4mm SMD"
  rect 2.6x1.6 smd: 1(-1.8,0) 2(1.8,0)
  silkscreen extent -3.1,-2.21 2.16,2.21, body extent -2.65,-2.15 2.65,2.15, height 3.95
SLF12575T-221M1R3-PF [mm]
  rect 2.6x3.2 smd: 1(-5.55,0) 2(5.55,0)
  silkscreen extent -7.48,-6.32 6.35,6.32, body extent -6.27,-6.33 6.33,6.27, height 7.5
SMA#1 [mm]
  rect 2x2 smd: 1(-2,0) 2(2,0)
  silkscreen extent -4.24,-1.55 2.08,1.55, body extent -2.6,-1.3 2.6,1.3, height 2.4
SMA#2 [mm]
  rect 2.5x1.7 smd: 1(-2,0) 2(2,0)
  silkscreen extent -4.45,-1.42 2.06,1.42, body extent -2.6,-1.3 2.6,1.3, height 2.4
SMAJ5.0CA [mm]
  rect 2x2 smd: 1(-2,0) 2(2,0)
  silkscreen extent -3.1,-1.52 2.06,1.52, body extent -2.6,-1.3 2.6,1.3, height 2.4
SMB [mm]
  rect 2.5x2.3 smd: 1(-2.15,0) 2(2.15,0)
  silkscreen extent -4.42,-1.91 2.27,1.9, body extent -2.7,-1.8 2.7,1.8, height 2.3
SOD-323 [mm]
  rect 0.8x0.9 smd mask+0.055: 1(-1.15,0) 2(1.15,0)
  silkscreen extent -2.01,-0.79 0.94,0.79, body extent -1.3,-0.67 1.3,0.67, height 1.1
SOIC-8 [mm]
  rect 1.6x0.65 smd: 1(-2.667,1.905) 2(-2.667,0.635) 3(-2.667,-0.635) 4(-2.667,-1.905) 5(2.733,-1.905) 6(2.733,-0.635) 7(2.733,0.635) 8(2.733,1.905)
  silkscreen extent -3.34,-2.54 1.99,2.68, body extent -3,-2.46 3,2.46, height 1.61
"Solder Bridge" [mil] "Solder Bridge ON"
  rect 30x35 smd: 1(-30,0) 2(30,0)
  silkscreen extent -50,-22 50,22
SOT23-3 [mm] "SOT23, 3-Leads, Body 2.9x1.3mm, Pitch 0.95mm, Lead Span 2.3mm - Reverse Pinning, IPC High Density"
  rect 0.8x0.8 smd: 1(-0.95,-1.075) 2(0.95,-1.075) 3(0,1.075)
  silkscreen extent -1.73,-1.19 1.55,0.74, body extent -1.5,-1.25 1.5,1.25, height 1.05
SOT-23 [mm] "TRANS NPN 40V 0.6A SOT23"
  rect 0.82x0.92 smd: 1(-0.95,-1) 2(0.95,-1) 3(0,1)
  silkscreen extent -1.82,-1.23 1.55,0.74, body extent -1.5,-1.25 1.5,1.25, height 1.1
SOT-23-5 [mm]
  rect 1.1x0.6 smd: 1(-1.3,0.95) 2(-1.3,0) 3(-1.3,-0.95) 4(1.3,-0.95) 5(1.3,0.95)
  silkscreen extent -1.74,-1.5 0.88,1.65, body extent -1.4,-1.45 1.4,1.45, height 1.45
SOT-23-6 [mm] "IC BAT CHG LI-ION 1 CELL SOT23-6"
  rect 1.12x0.62 smd: 1(-1.3,0.95) 2(-1.3,0) 3(-1.3,-0.95) 4(1.3,-0.95) 5(1.3,0) 6(1.3,0.95)
  silkscreen extent -1.57,-1.5 0.86,1.7, body extent -1.4,-1.45 1.4,1.45, height 1.44
SOT-223 [mm]
  rect 0.95x2.15 smd: 1(-2.3,-2.9) 2(0,-2.9) 3(2.3,-2.9)
  rect 3.25x2.15 smd: 4(0,2.9)
  silkscreen extent -3.6,-3.07 3.3,1.75, body extent -3.28,-3.51 3.22,3.45, height 1.65
SS510B [mm]
  rect 2.4x2.8 smd: 1(-2.3,0) 2(2.3,0)
  silkscreen extent -4.57,-1.91 2.03,1.9, body extent -2.7,-1.8 2.7,1.8, height 2.3
TBP01R1-508-02BE [mm]
  rect 3x3 hole 1.7: 1(-2.54,0)
  round 3 hole 1.7: 2(2.54,0)
  silkscreen extent -5.88,-2 5.88,10, body extent -5.83,-1.98 5.93,10.02, height 8.5
TBP01R1-508-03BE [mm]
  rect 3x3 hole 1.7: 1(-2.54,0)
  round 3 hole 1.7: 2(2.54,0) 3(7.62,0)
  silkscreen extent -5.88,-2 10.96,10, body extent -5.88,-2.04 10.96,9.96, height 8.5
TBP01R1-508-04BE [mm]
  rect 3x3 hole 1.7: 1(-5.08,0)
  round 3 hole 1.7: 2(0,0) 3(5.08,0) 4(10.16,0)
  silkscreen extent -8.42,-2 13.5,10, body extent -8.46,-1.99 13.46,10.01, height 8.5
"TEST POINT" [mil]
  oct 60x60 smd: 1(0,0)
  silkscreen extent -37,-37 37,37
TL3300CF160Q [mm] "SWITCH TACTILE SPST-NO 0.05A 12V"
  rect 2.5x1.8 smd: 1(-7.75,2.5) 2(7.75,2.5) 3(-7.75,-2.5) 4(7.75,-2.5)
  silkscreen extent -7.71,-6.12 6.15,6.12, body extent -7.5,-5.98 7.5,6.02, height 8.77
UWX1E101MCL1GB [mm]
  rect 5.3x3.3 smd: 1(-3.65,0) 2(3.65,0)
  silkscreen extent -5.59,-4.32 4.27,4.32, body extent -4.65,-4.25 4.65,4.25, height 10.34
VT1H471MI135000CE0 [mm] "470uF ±20% 50V 12.5mm 13.5mm 1000hrs 105? -40?~+105? SMD,12.5x13.5mm Aluminum Electrolytic Capacitors - SMD RoHS"
  rect 6.2x1.75 smd: 1(-5.145,0) 2(5.145,0)
  silkscreen extent -8.62,-6.81 8.74,6.86, body extent -7.5,-6.85 7.5,6.85, height 14
X321532768KGD2SI [mm]
  rect 1x1.8 smd: 1(-1.25,0) 2(1.25,0)
  silkscreen extent -0.58,-0.81 0.58,0.81, body extent -1.6,-0.75 1.6,0.75, height 0.9
XC32M4-8.000-F18LJDT [mm]
  rect 1.3x1.2 smd: 1(-1.1,-0.85) 2(1.1,-0.85) 3(1.1,0.85) 4(-1.1,0.85)
  silkscreen extent -1.68,-1.85 1.65,1.3, body extent -1.6,-1.25 1.6,1.25, height 0.8
YS-SBZ9032C03R16 [mm] "NO 2700Hz 85dB @ 3V, 10cm 3V F9mm SMD,9x3.2mm Buzzers RoHS"
  rect 3x1.8 smd: 1(-4,0) 2(4,0)
  silkscreen extent -5.46,-4.5 6.06,6.54, body extent -5.25,-4.5 5.25,6.5, height 3.3

## Part data
C1 C4 C17 C21 C23 C24 C31 C43 C58 C61 C63 C65 C67: library part RVT1E100M0405, "CAP ALUM 10uF 25V SMD", Manufacturer=ROQANG, Operating Temperature=-45℃~+105℃, Rated Voltage=25V, Tolerance=±20%, Capacitance=10uF, L=5.4mm, φD=4mm
C2: library part CC1206KKX7R0BB104, "CAP CER 0.1UF 100V X7R 1206", Capacitance=100nF, Case Code (Imperial)=1206, Case Code (Metric)=3216, Dielectric=X7R, Dielectric Material=Ceramic, LCSC Part Number=C107181, Manufacturer=Yageo, Max Operating Temperature=125°C, Min Operating Temperature=-55°C, Package Quantity=1, Tolerance=10%, Voltage=63V, Voltage Rating=100V, Case/Package=1206, Category="Ceramic Capacitors", ComponentLink1Description=https://datasheet.ciiva.com/7978/1447671-7978227.pdf?src-supplier=Element14, ComponentLink1URL=https://datasheet.ciiva.com/7978/1447671-7978227.pdf?src-supplier=Element14, ComponentLink2Description=https://datasheet.ciiva.com/46391/1919308-46391993.pdf?src-supplier=Element14, ComponentLink2URL=https://datasheet.ciiva.com/46391/1919308-46391993.pdf?src-supplier=Element14, ComponentLink3Description=https://datasheet.ciiva.com/180/mlccorderingcode-180145.pdf?src-supplier=Digi-Key, ComponentLink3URL=https://datasheet.ciiva.com/180/mlccorderingcode-180145.pdf?src-supplier=Digi-Key, ComponentLink4Description=https://datasheet.ciiva.com/180/mlccorderingcode-180144.pdf?src-supplier=Digi-Key, ComponentLink4URL=https://datasheet.ciiva.com/180/mlccorderingcode-180144.pdf?src-supplier=Digi-Key, ComponentLink5Description=https://datasheet.ciiva.com/180/mlccorderingcode-180146.pdf?src-supplier=Digi-Key, ComponentLink5URL=https://datasheet.ciiva.com/180/mlccorderingcode-180146.pdf?src-supplier=Digi-Key, ComponentLink6Description=https://datasheet.ciiva.com/5425/upy-gp-np0-16v-to-50v-8-5425573.pdf?src-supplier=Mouser, ComponentLink6URL=https://datasheet.ciiva.com/5425/upy-gp-np0-16v-to-50v-8-5425573.pdf?src-supplier=Mouser, ComponentLink7Description=https://datasheet.ciiva.com/16981/upy-np0x7r-mv-100-to-630v-9-16981180.pdf?src-supplier=Future+Electronics, ComponentLink7URL=https://datasheet.ciiva.com/16981/upy-np0x7r-mv-100-to-630v-9-16981180.pdf?src-supplier=Future+Electronics, ComponentLink8Description=https://datasheet.ciiva.com/26829/getdatasheetpartid-403790-26829655.pdf?src-supplier=Verical, ComponentLink8URL=https://datasheet.ciiva.com/26829/getdatasheetpartid-403790-26829655.pdf?src-supplier=Verical, Depth=1.6mm, Height=1.25mm, Item Type=Capacitor, Lead Free="Lead Free", Length=3.2mm, Manufacturer Part Number=CC1206KKX7R0BB104, Mount="Surface Mount", Number of Pins=2, Packaging="Tape and Reel", Pricing 1="3000=0.01588, 6000=0.01565, 12000=0.01520, 18000=0.01486, 24000=0.01429, 30000=0.01395, 300000=0.01361 (USD)", Radiation Hardening=No, Reach SVHC Compliant=Yes, Resistor Type=Ceramic, RoHS=Yes, RoHS Compliant=Yes, Series=CC, Stock 1=24000, Supplier 1=Avnet, Supplier Part Number 1=CC1206KKX7R0BB104, Termination=SMD/SMT, Thickness=0.057inch, Voltage Rating (DC)=100V, Width=0.063inch
C3 C8 C11 C14 C19 C45 C59: library part CC0603KRX5R8BB105, "CAP CER 1UF 25V X5R 0603", Case Code (Imperial)=0603, Case Code (Metric)=1608, Dielectric=X5R, Manufacturer=Yageo, Max Operating Temperature=85°C, Min Operating Temperature=-55°C, Package Quantity=1, Supplier Part Number 1=311-1445-6-ND, Tolerance=10%, Voltage Rating=25V, Capacitance=1uF, Case/Package=0603, ComponentLink1Description=http://www.yageo.com/documents/recent/UPY-GPHC_X5R_4V-to-50V_25.pdf?src-supplier=Digi-Key, ComponentLink1URL=http://www.yageo.com/documents/recent/UPY-GPHC_X5R_4V-to-50V_25.pdf?src-supplier=Digi-Key, ComponentLink2Description=http://www.yageo.com/documents/recent/UPY-GPHC_X5R_4V-to-50V_12.pdf?src-supplier=Avnet+Europe, ComponentLink2URL=http://www.yageo.com/documents/recent/UPY-GPHC_X5R_4V-to-50V_12.pdf?src-supplier=Avnet+Europe, ComponentLink3Description=http://www.farnell.com/datasheets/1525783.pdf?src-supplier=Element14, ComponentLink3URL=http://www.farnell.com/datasheets/1525783.pdf?src-supplier=Element14, ComponentLink4Description=http://www.yageo.com/documents/recent/UPY-GPHC_X5R_4V-to-50V_12.pdf?src-supplier=Avnet, ComponentLink4URL=http://www.yageo.com/documents/recent/UPY-GPHC_X5R_4V-to-50V_12.pdf?src-supplier=Avnet, Depth=0.8mm, Halogen Free="Halogen Free", Height=0.8mm, Lead Free="Lead Free", Length=1.6mm, Manufacturer Part Number=CC0603KRX5R8BB105, Mount="Surface Mount", Number of Pins=2, Packaging="Tape and Reel", Pricing 1="1=0.1, 10=0.069, 100=0.0307, 500=0.0219, 1000=0.0172 (USD)", Radiation Hardening=No, REACH SVHC="No SVHC", Stock 1=1419041, Supplier 1=Digi-Key, Termination=SMD/SMT, Thickness=0.035inch, Voltage Rating (DC)=25V, Width=0.031inch
C5 C7 C12 C13 C16: library part VT1H471MI135000CE0, "470uF ±20% 50V 12.5mm 13.5mm 1000hrs 105℃ -40℃~+105℃ SMD,12.5x13.5mm Aluminum Electrolytic Capacitors - SMD RoHS", Lifetime @ Temp="1000hrs 105℃", Manufacturer="Changzhou Huawei Elec", Operating Temperature=-40℃~+105℃, Package=SMD,12.5x13.5mm, Rated Voltage=50V, Tolerance=±20%, Capacitance=470uF, L=13.5mm, φD=12.5mm
C6 C10 C15 C18 C22 C25 C26 C27 C28 C29 C30 C33 C36 C37 C38 C39 C40 C41 C44 C46 C47 C48 C49 C51 C52 C55 C57 C60 C62 C64 C66 C68 C69 C73 C76: library part CC0603ZRY5V9BB104, "CAP CER 0.1UF 50V Y5V 0603", Capacitance=100nF, Case Code (Imperial)=0603, Case Code (Metric)=1608, Dielectric=Y5V, Manufacturer=Yageo, Max Operating Temperature=85°C, Min Operating Temperature=-30°C, Package Quantity=1, Supplier Part Number 1=311-1343-1-ND, Tolerance=80%, Voltage=50V, Case/Package=0603, ComponentLink1Description=http://www.yageo.com/documents/recent/UPY-GPHC_Y5V_6.3V-to-50V_8.pdf?src-supplier=Digi-Key, ComponentLink1URL=http://www.yageo.com/documents/recent/UPY-GPHC_Y5V_6.3V-to-50V_8.pdf?src-supplier=Digi-Key, ComponentLink2Description=http://www.yageo.com/documents/recent/UPY-GPHC_Y5V_6.3V-to-50V_5.pdf?src-supplier=Avnet+Europe, ComponentLink2URL=http://www.yageo.com/documents/recent/UPY-GPHC_Y5V_6.3V-to-50V_5.pdf?src-supplier=Avnet+Europe, ComponentLink3Description=https://www.verical.com/server-webapp/html/getDatasheet?partID=403611&src-supplier=Verical, ComponentLink3URL=https://www.verical.com/server-webapp/html/getDatasheet?partID=403611&src-supplier=Verical, ComponentLink4Description=http://www.mouser.com/ds/2/447/Yageo_UPY-GP_NP0_16V-to-50V_9-358835.pdf?src-supplier=Mouser, ComponentLink4URL=http://www.mouser.com/ds/2/447/Yageo_UPY-GP_NP0_16V-to-50V_9-358835.pdf?src-supplier=Mouser, ComponentLink5Description=http://www.farnell.com/datasheets/1132289.pdf?src-supplier=Element14, ComponentLink5URL=http://www.farnell.com/datasheets/1132289.pdf?src-supplier=Element14, Composition=Ceramic, Depth=0.8mm, Halogen Free="Halogen Free", Height=0.8mm, Lead Free="Lead Free", Length=1.6mm, Manufacturer Part Number=CC0603ZRY5V9BB104, Mount="Surface Mount", Number of Pins=2, Packaging="Tape and Reel", Pricing 1="1=0.1, 10=0.075, 100=0.0334, 500=0.02386, 1000=0.01874 (USD)", Radiation Hardening=No, REACH SVHC="No SVHC", Stock 1=15000880, Supplier 1=Digi-Key, Termination=SMD/SMT, Thickness=0.035inch, Voltage Rating=50V, Voltage Rating (DC)=50V, Width=0.031inch
C9: library part UWX1E101MCL1GB, "CAP ALUM 100UF 20% 25V SMD", Case/Package=Radial, Dielectric Material=Aluminium, Leakage Current=3uA, Manufacturer=Nichicon, Max Operating Temperature=85°C, Min Operating Temperature=-40°C, Package Quantity=1000, Ripple Current=110mA, Supplier Part Number 1=493-2113-6-ND, Tolerance=20%, Voltage=25V, Capacitance=100uF, Category="Aluminum Electrolytic Capacitors", ComponentLink1Description=http://nichicon-us.com/english/products/pdfs/e-uwx.pdf?src-supplier=Digi-Key, ComponentLink1URL=http://nichicon-us.com/english/products/pdfs/e-uwx.pdf?src-supplier=Digi-Key, ComponentLink2Description=http://www.nichicon.co.jp/english/products/pdfs/e-ch_ref.pdf?src-supplier=Mouser, ComponentLink2URL=http://www.nichicon.co.jp/english/products/pdfs/e-ch_ref.pdf?src-supplier=Mouser, ComponentLink3Description=http://www.nichicon.co.jp/english/products/pdfs/e-wx.pdf?src-supplier=Avnet, ComponentLink3URL=http://www.nichicon.co.jp/english/products/pdfs/e-wx.pdf?src-supplier=Avnet, ComponentLink4Description=http://uk.rs-online.com/webdocs/0fa3/0900766b80fa3a90.pdf?src-supplier=RSComponents, ComponentLink4URL=http://uk.rs-online.com/webdocs/0fa3/0900766b80fa3a90.pdf?src-supplier=RSComponents, ComponentLink5Description=http://nichicon-us.com/english/products/pdfs/e-wx.pdf?src-supplier=Future+Electronics, ComponentLink5URL=http://nichicon-us.com/english/products/pdfs/e-wx.pdf?src-supplier=Future+Electronics, ComponentLink6Description=http://www.nichicon.co.jp/english/products/pdfs/e-ch_ref.pdf?src-supplier=Avnet+Europe, ComponentLink6URL=http://www.nichicon.co.jp/english/products/pdfs/e-ch_ref.pdf?src-supplier=Avnet+Europe, ComponentLink7Description=http://www.farnell.com/datasheets/2364658.pdf?src-supplier=Element14, ComponentLink7URL=http://www.farnell.com/datasheets/2364658.pdf?src-supplier=Element14, ComponentLink8Description=https://datasheet.ciiva.com/11778/0900766b80fa3a90-11778418.pdf?src-supplier=RSComponents, ComponentLink8URL=https://datasheet.ciiva.com/11778/0900766b80fa3a90-11778418.pdf?src-supplier=RSComponents, ComponentLink9Description=https://datasheet.ciiva.com/17527/e-wx-17527624.pdf?src-supplier=Avnet+Europe, ComponentLink9URL=https://datasheet.ciiva.com/17527/e-wx-17527624.pdf?src-supplier=Avnet+Europe, ComponentLink10Description=https://datasheet.ciiva.com/5361/e-wx-11809-5361100.pdf?src-supplier=Mouser, ComponentLink10URL=https://datasheet.ciiva.com/5361/e-wx-11809-5361100.pdf?src-supplier=Mouser, ComponentLink11Description=https://datasheet.ciiva.com/28458/1912851-28458684.pdf?src-supplier=Element14, ComponentLink11URL=https://datasheet.ciiva.com/28458/1912851-28458684.pdf?src-supplier=Element14, ComponentLink12Description=https://datasheet.ciiva.com/96/e-wx-96650.pdf?src-supplier=Digi-Key, ComponentLink12URL=https://datasheet.ciiva.com/96/e-wx-96650.pdf?src-supplier=Digi-Key, ComponentLink13Description=https://datasheet.ciiva.com/96/e-wx-96651.pdf?src-supplier=Digi-Key, ComponentLink13URL=https://datasheet.ciiva.com/96/e-wx-96651.pdf?src-supplier=Digi-Key, ComponentLink14Description=https://datasheet.ciiva.com/96/e-wx-96652.pdf?src-supplier=Digi-Key, ComponentLink14URL=https://datasheet.ciiva.com/96/e-wx-96652.pdf?src-supplier=Digi-Key, ComponentLink15Description=https://datasheet.ciiva.com/11687/e-wx-11687148.pdf?src-supplier=Avnet, ComponentLink15URL=https://datasheet.ciiva.com/11687/e-wx-11687148.pdf?src-supplier=Avnet, ComponentLink16Description=https://datasheet.ciiva.com/16512/e-wx-16512638.pdf?src-supplier=Future+Electronics, ComponentLink16URL=https://datasheet.ciiva.com/16512/e-wx-16512638.pdf?src-supplier=Future+Electronics, Construction=Cylindrical, Diameter=8mm, Dissipation Factor=0.14%, Height=5.4mm, Height - Seated (Max)=0.213inch, Lead Diameter=0.8mm, Lead Free="Lead Free", Lead Pitch=2.3mm, Length=5.4mm, Life (Hours)=2000Hour, Manufacturer Part Number=UWX1E101MCL1GB, Mount="Surface Mount", Number of Pins=2, Packaging="Tape and Reel", Polarity=Polar, Pricing 1="1=0.43, 10=0.301, 50=0.211, 100=0.1808, 500=0.13558 (USD)", Pricing 2="1=0.43000, 10=0.30100, 50=0.21100, 100=0.18080, 500=0.13558 (USD)", Radiation Hardening=No, REACH SVHC="No SVHC", Ripple Current (AC)=110mA, RoHS=Yes, RoHS Compliant=Yes, Series=WX, Stock 1=30613, Stock 2=25010, Supplier 1=Digi-Key, Supplier 2=Digi-Key, Supplier Part Number 2=493-2113-1-ND, Termination=SMD/SMT, Voltage Rating=25V, Voltage Rating (DC)=25V, Weight=0.01lb, Width=0.25inch